# Altium PCB Motherboard.PcbDoc (part 2 of 4)
Units mm, origin at the board's own origin, x right, y up, seen from the top; angles counter-clockwise.
Board outline 133.86 x 61.62 mm, 4 copper layers (Top Layer, Ground Plane, Power Plane, Bottom Layer), stack 1.586 mm thick; 226 components, 149 nets, 791 pads, 852 vias.
Unrouted connection lines stored in the file: 19.
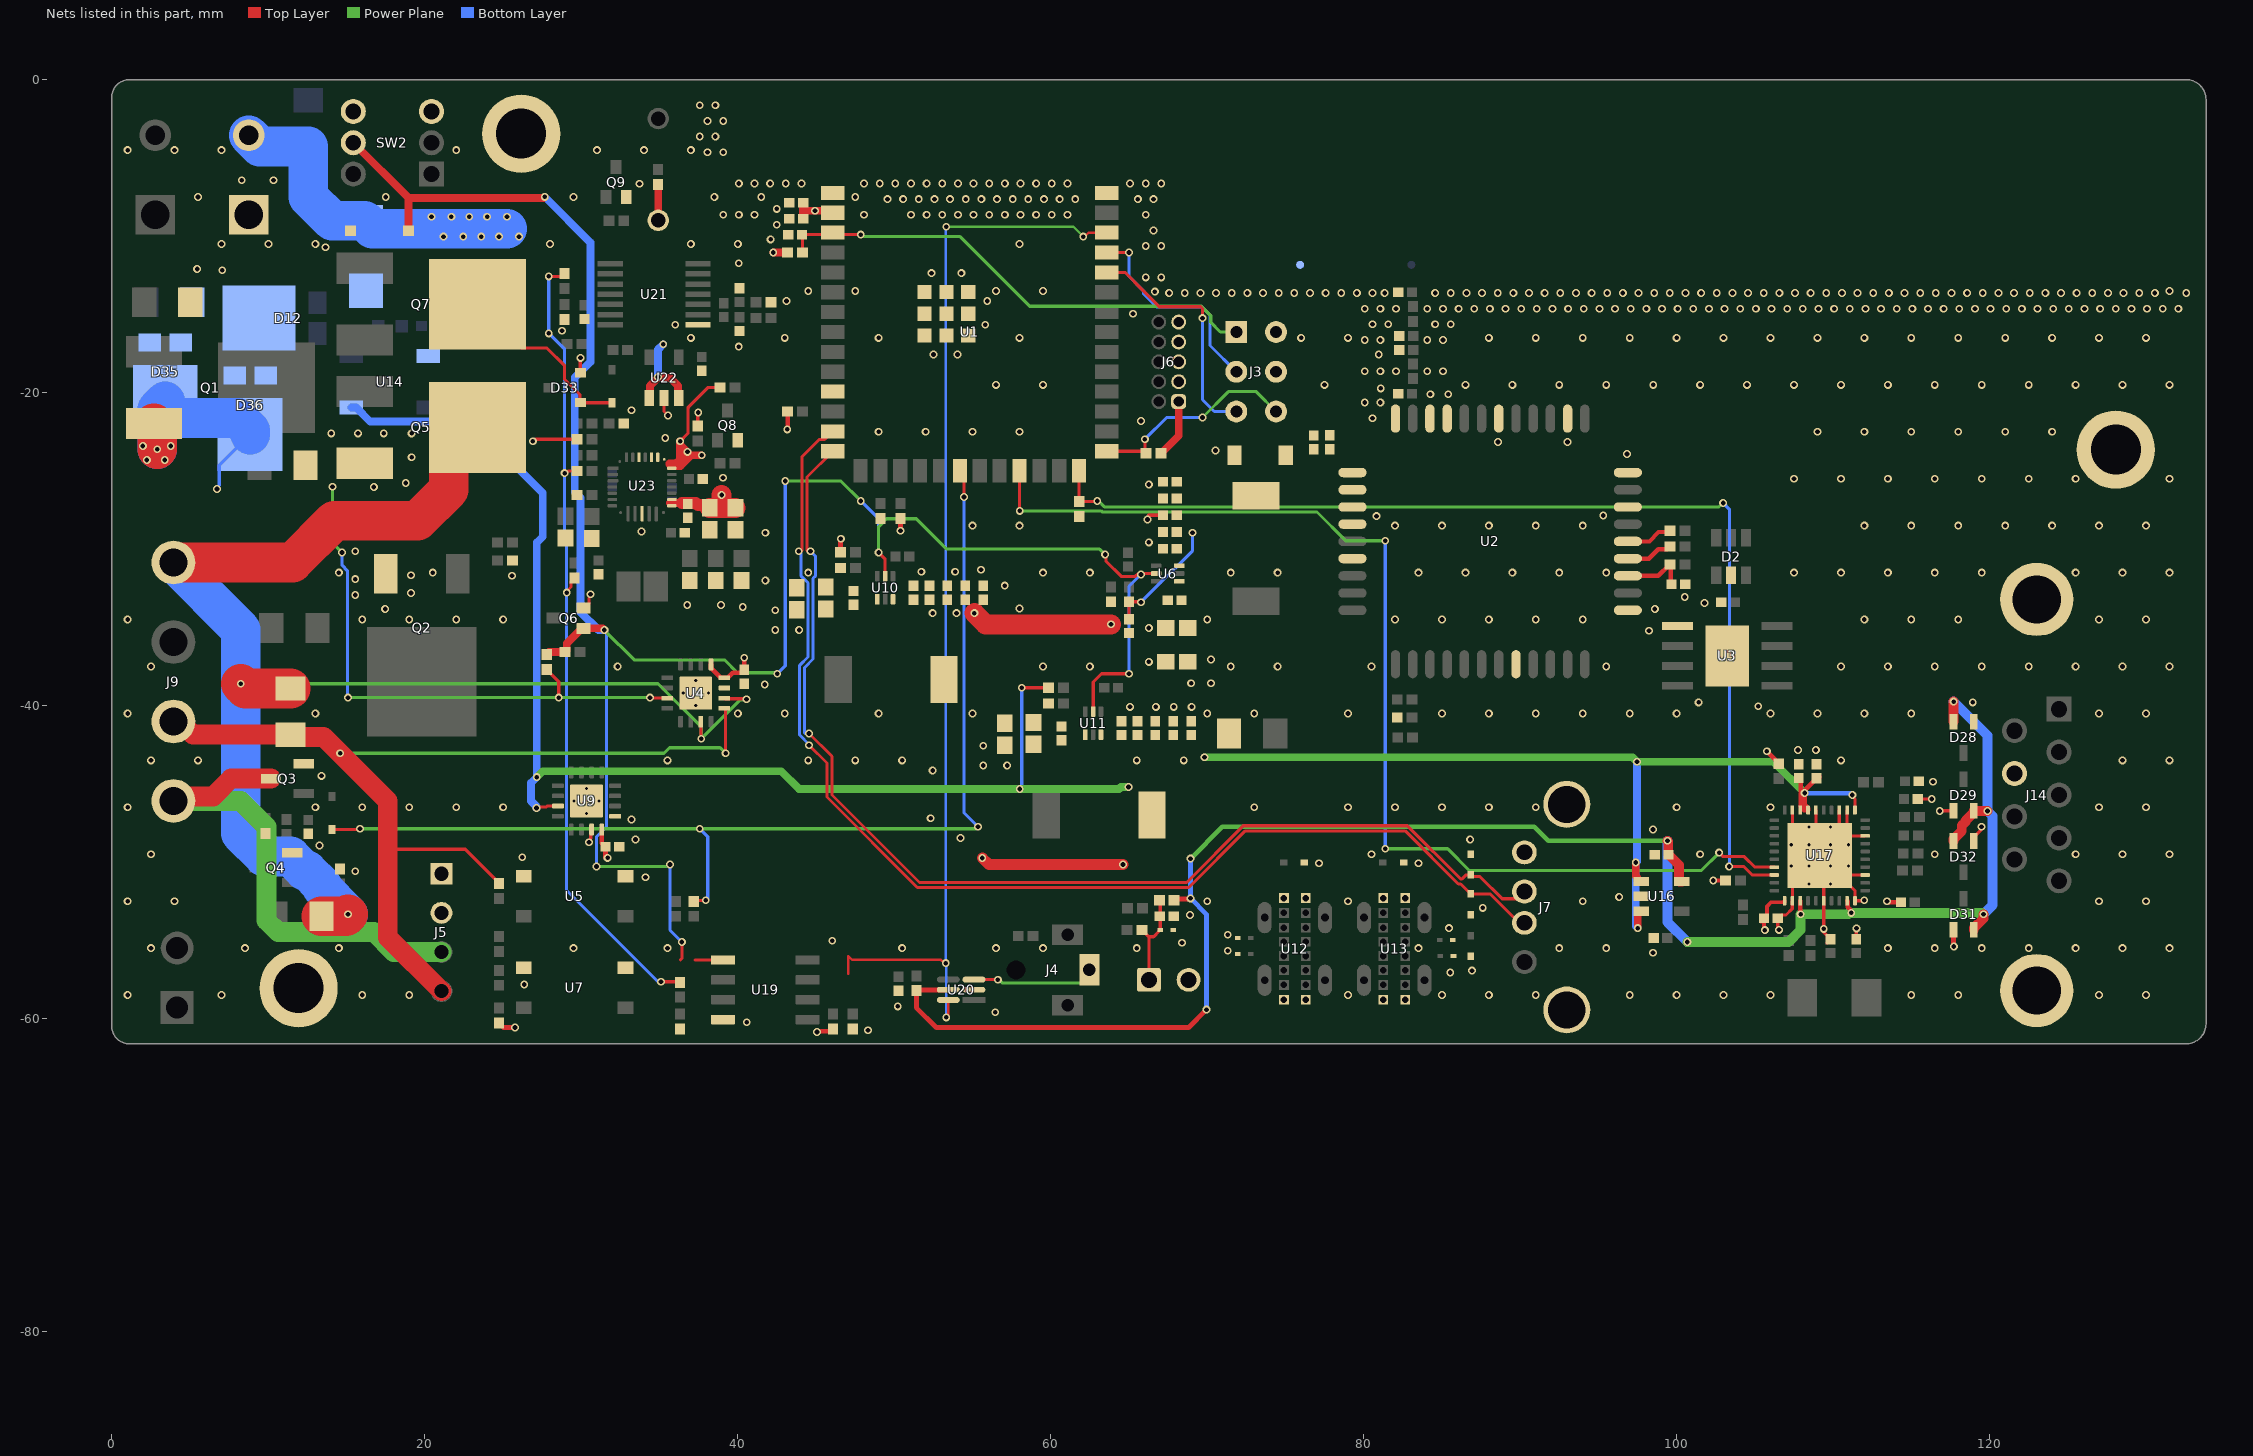
[diagram p4: the nets of this part, all layers, seen from the top]

## Part data
BUZ1: library part CMP-581a9557be5887dd-1, "Audio Buzzer Magnetic 3Vo-p 5Vo-p 70mA 3.5Vo-p 85dB Through Hole Pin Tray", LCSC_PN=C252915, Manufacturer Part Number=CMT-1285C-035, Manufacturer Part Number 2=GMC1205YA-16R2048, Lead-Free Status="Lead Free", Mounting Style="Through Hole", Octopart URL=https://octopart.com/cmt-1285c-035-cui-71811876, OctopartID=581a9557be5887dd, RoHS=Compliant
C1 C5 C6 C8 C9 C10 C11 C13 C14 C16 C30 C33 C34 C38 C41 C42 C46 C50 C59 C60 C62 C63 C64 C70 C73: library part CMP-1662-00020-1, LCSC_PN=C77020, ComponentLink1Description="Manufacturer URL", ComponentLink1URL=http://www.murata.com/, ComponentLink2Description=Datasheet, ComponentLink2URL=http://psearch.en.murata.com/capacitor/product/GRM155R60J105KE19%23.pdf
C2 C3 C21 C22 C23 C24 C25 C26 C27 C28 C29 C35 C36 C37 C49: library part CMP-1662-00020-1, LCSC_PN=C77000, ComponentLink1Description="Manufacturer URL", ComponentLink1URL=http://www.murata.com/, ComponentLink2Description=Datasheet, ComponentLink2URL=http://psearch.en.murata.com/capacitor/product/GRM155R60J105KE19%23.pdf
C4 C7 C15 C17 C52 C53 C61 C65 C66: library part CMP-1662-00020-1, LCSC_PN=C77009, ComponentLink1Description="Manufacturer URL", ComponentLink1URL=http://www.murata.com/, ComponentLink2Description=Datasheet, ComponentLink2URL=http://psearch.en.murata.com/capacitor/product/GRM155R60J105KE19%23.pdf
C12 C43 C54 C58: library part CMP-1662-00020-1, LCSC_PN=C33149, ComponentLink1Description="Manufacturer URL", ComponentLink1URL=http://www.murata.com/, ComponentLink2Description=Datasheet, ComponentLink2URL=http://psearch.en.murata.com/capacitor/product/GRM155R60J105KE19%23.pdf
C31 C32 C39 C40 C44 C45 C67 C68 C69 C71 C72 C77 C78: library part CMP-06035-022879-1, LCSC_PN=C91606
C55: library part CMP-1662-00020-1, LCSC_PN=C60133, ComponentLink1Description="Manufacturer URL", ComponentLink1URL=http://www.murata.com/, ComponentLink2Description=Datasheet, ComponentLink2URL=http://psearch.en.murata.com/capacitor/product/GRM155R60J105KE19%23.pdf
C56 C57: library part CMP-1662-00020-1, LCSC_PN=C77002, ComponentLink1Description="Manufacturer URL", ComponentLink1URL=http://www.murata.com/, ComponentLink2Description=Datasheet, ComponentLink2URL=http://psearch.en.murata.com/capacitor/product/GRM155R60J105KE19%23.pdf
C74 C76: library part CMP-1662-00020-1, LCSC_PN=C272875, ComponentLink1Description="Manufacturer URL", ComponentLink1URL=http://www.murata.com/, ComponentLink2Description=Datasheet, ComponentLink2URL=http://psearch.en.murata.com/capacitor/product/GRM155R60J105KE19%23.pdf
C75: library part CMP-1662-00020-1, LCSC_PN=C106205, ComponentLink1Description="Manufacturer URL", ComponentLink1URL=http://www.murata.com/, ComponentLink2Description=Datasheet, ComponentLink2URL=http://psearch.en.murata.com/capacitor/product/GRM155R60J105KE19%23.pdf
D1 D3 D30 D39 D40: "TVS Diode (Bi-directional)", LCSC_PN=C383211, Manufacturer_Name=LRC, Height=0.7mm, Manufacturer_Part_Number=LESD5D5.0CT1G
D2: library part CMP-924f5b40f9684d88-1, "ESDA Series 5 Channel 6.1 V 50 pF SMT Uni Directional Transil Array - SOT-23-6L", Breakdown Voltage="7.20 V", Case/Package=SOT-23, LCSC_PN=C6650, Operating Voltage="6.10 V", Power Rating="100 W", Lead-Free Status="Lead Free", Lifecycle Status=Active, Manufacturer Part Number=ESDA6V1-5SC6, Mounting Style="Surface Mount", Number of Pins=6, Octopart URL=http://octopart.com/esda6v1-5sc6-stmicroelectronics-347713, OctopartID=924f5b40f9684d88, Packaging="Tape & Reel (TR), Cut Tape (CT)", REACH SVHC Compliance="No SVHC", RoHS=Compliant, Size-Height="1.45 mm", Size-Length="3.05 mm", Size-Width="1.75 mm", TME=ESDA6V1-5SC6, Voltage Rating (DC)="6.10 V"
D4 D5 D7 D10 D11: library part CMP-1063-00120-1, "Transient Voltage Suppressor, Micro-Packaged Diode for ESD Protection, 2-Pin SOD-923, Pb-Free, Tape and Reel", LCSC_PN=C96512, Manufacturer="On Semiconductor", ComponentLink1Description="Manufacturer URL", ComponentLink1URL=http://www.onsemi.com/, ComponentLink2Description=Datasheet, ComponentLink2URL=http://www.onsemi.cn/pub_link/Collateral/ESD9B-D.PDF, ComponentLink3Description="Package Specification", ComponentLink3URL=http://www.onsemi.com/pub_link/Collateral/514AB.PDF, DatasheetVersion="Rev. 2", Direction=Bidirectional, IR Max (uA)=1, Mounting Technology="Surface Mount", Number of Lines=1, PackageDescription="2-Pin SOD, Body 0.8 x 0.6 mm", PackageReference=SOD-923-2-514AB-01, PackageVersion="Rev. C, 03/2011", Packing="Tape and Reel", PartNumber=ESD9B3.3ST5G, RoHS=Pb-Free, V(BR) Min (V)=5, VRWM Max (V)=3.3
D6: "TVS Diode (Uni-directional)", LCSC_PN=C404130, Manufacturer_Name=Vishay, Mouser Part Number=N/A, Datasheet Link=http://www.vishay.com/docs/88392/smbj.pdf, Height=2.44mm, Manufacturer_Part_Number=SMBJ13A, Mouser Price/Stock=https://www.mouser.co.uk/ProductDetail/Vishay-Semiconductors/SMBJ13A?qs=%252BA9HMDDz5KZG4MvB2mvPow%3D%3D
D8: library part CMP-1060-00573-1, "Zener Voltage Regulator, 500 mW, 2-Pin SOD-123, Pb-Free, Tape and Reel", LCSC_PN=C2759896, Manufacturer="On Semiconductor", ComponentLink1Description="Manufacturer URL", ComponentLink1URL=http://www.onsemi.com/, ComponentLink2Description=Datasheet, ComponentLink2URL=http://www.onsemi.com/pub_link/Collateral/MMSZ5221BT1-D.PDF, ComponentLink3Description="Package Specification", ComponentLink3URL=http://www.onsemi.com/pub_link/Collateral/425-04.PDF, DatasheetVersion="Rev. 12", Mounting Technology="Surface Mount", P Max (W)=0.5, PackageDescription="2-Pin SOD, Body 1.6 x 2.69 mm", PackageReference=SOD-123-2-425-04, PackageVersion="Rev. G, 10/2009", Packing="Tape and Reel", PartNumber=MMSZ5231BT1G, RoHS=Pb-Free, VZ Typ (V)=5.1
D9 D34: library part CMP-12790-000032-1, "DIODE SCHOTTKY 70V 150MW SOD323", Capacitance=2pF, Forward Current=15mA, LCSC_PN=C151442, Manufacturer="Diodes Inc", Max Junction Temp=+125°C, Max Repetitive Reverse Voltage=70V, Package=SOD323, Reverse Voltage=49V, Temperature="-55°C to +125°C", Temperature Range Low=-55°C, Automotive=No, Category=Diode, ComponentLink2Description=Datasheet, ComponentLink2URL=https://www.diodes.com/assets/Datasheets/ds31033.pdf, Device Class L1="Discrete Semiconductors", Device Class L2=Diodes, Device Class L3="Schottky Diodes", Digikey Description="DIODE SCHOTTKY 70V 150MW SOD323", Footprint Url=https://www.diodes.com/assets/Package-Files/SOD323.pdf, Height=1.2mm, Lead Free=Yes, Manufacturer Part Number=1N5711WS-7-F, Mouser Description="Schottky Diodes & Rectifiers 70V 200mW", Octopart=https://octopart.com/1n5711ws-7-f-diodes+inc.-323167, RoHS=TRUE, Standoff Height=0.05mm, Temperature Range High=+125°C
D12 D35 D36: library part CMP-00278-84328658-1, "FSV1550V Rectifier Diode, Schottky, 1 Phase, 1 Element, 15A, 50V V(RRM), Silicon, TO-277", Average Rectified Current=15A, Case/Package=TO-277-3, LCSC_PN=C668953, Manufacturer Lifecycle Status=ACTIVE, Max Forward Surge Current (Ifsm)=300A, Max Repetitive Reverse Voltage (Vrrm)=50V, Element Configuration=Single, Forward Current=15A, Lifecycle Status=Production, Max Reverse Voltage (DC)=50V, Mount="Surface Mount", NexarPartId=84328658, Packaging="Cut Tape", RoHS=Compliant, Schedule B="8541100080, 8541100080", Weight=113.6mg
D27: library part CMP-02520-000013-1, "LED BLUE 0603 SMD", Ambient Temperature Range High=+80°C, Ambient Temperature Range Low=-20°C, Colour=Blue, Forward Current=20mA, Forward Voltage=3.8V, LCSC_PN=C435849, Manufacturer="Vishay Semiconductor Opto Division", Package=6.541-5094.01-4, Power Dissipation=76mW, Temperature="-20°C to +80°C", Automotive=No, Category=Diode, ComponentLink2Description=Datasheet, ComponentLink2URL=http://www.vishay.com/docs/82437/vlmo1300.pdf, Device Class L1=Optoelectronics, Device Class L2=LEDs, Device Class L3=unset, Digikey Description="LED BLUE 0603 SMD", Height=1mm, Lead Free=Yes, Led Orientation="Top View", Luminous Intensity=28-180mcd, Manufacturer Part Number=VLMB1300-GS08, Mouser Description="LED; SMD; 0603; blue; 28-180mcd; 1.6x0.8x0.8mm; 130°; 2.8÷3.8V; 20mA", Octopart=https://octopart.com/vlmb1300-gs08-vishay-22022408, Peak Emmision Wavelength=468nm, RoHS=TRUE, Temperature Range High=+80°C, Temperature Range Low=-20°C, Viewing Angle=130°, Wavelength=475nm
D28 D29 D31 D32: "Diode", LCSC_PN=C93035, Manufacturer_Name="Diodes Inc.", Mouser Part Number=621-BAV99W-F, Arrow Part Number=BAV99W-7-F, Arrow Price/Stock=https://www.arrow.com/en/products/bav99w-7-f/diodes-incorporated?region=europe, Datasheet Link=https://www.diodes.com/assets/Datasheets/ds30045.pdf, Height=1.1mm, Manufacturer_Part_Number=BAV99W-7-F, Mouser Price/Stock=https://www.mouser.co.uk/ProductDetail/Diodes-Incorporated/BAV99W-7-F?qs=KrBKXozF1ElcNxS3QKF7wg%3D%3D
D33: library part CMP-0417-00003-1, "Schottky Barrier Diode, 30 V, 2 uA, -55 to 150 degC, 3-Pin SOT23, RoHS, Tape and Reel", LCSC_PN=C181200, Manufacturer="NXP Semiconductors", Temperature Range="-55 to 150 degC", Cd (pF)=10, ComponentLink1Description="Manufacturer URL", ComponentLink1URL=http://www.nxp.com/, ComponentLink2Description=Datasheet, ComponentLink2URL=http://www.nxp.com/documents/data_sheet/BAT54_SER.pdf, DatasheetVersion="Rev. 5", IR (uA)=2, Mounting Technology="Surface Mount", PackageDescription="3-Pin Plastic Surface-mounted Package, Body 1.3 x 2.9 mm, Pitch 0.95 mm", PackageReference=SOT23-3, Packing="Tape and Reel", PartNumber=BAT54C, RoHS=TRUE, Rth(j-a) (K/W)=500, Trr (ns)=5, VF (mV)=800, VR (V)=30
J1 J15: library part CMP-7a42b7ee166ba585-1, "Terminal block, 5mm 2 Pos, through hole male.", LCSC Part=C8445, Manufacturer Part Number="2EDGK-5.08-02P-14-00AH + 2EDGVC-5.08-02P", Manufacturer Part Number 2="WJ2EDGVC-5.08-2P + WJ2EDGK-5.08-2P", LCSC_PN=C8445, Octopart URL=https://octopart.com/2edgk-5.08-02p-14-00ah-degson-78006607, OctopartID=7a42b7ee166ba585
J2: library part CMP-1d67d451da9ec2a0-3, "Conn Shrouded Header HDR 2 POS 2.5mm Solder ST Thru-Hole Box", LCSC Part=C158012, Manufacturer Part Number=B2B-XH-A, Contact Material="Phosphor Bronze", LCSC_PN=C158012, Octopart URL=https://octopart.com/b2b-xh-a-jst-3990175, OctopartID=1d67d451da9ec2a0, Orientation=Straight
J3: library part CMP-bcf575fbeff46332-1, "Dual Row Connector Female Samtec SLW-103-01-T-D", Color=Black, LCSC_PN=C492420, Manufacturer Part Number=SLW-103-01-T-D, Operating Temperature="105 °C (max)", Voltage Rating (AC)="400 V", Contact Material="Phosphor Bronze", Contact Plating=Tin, Gender=Female, Housing Color=Black, Housing Material=Plastic, Lead-Free Status="Lead Free", Mounting Style="Through Hole, Vertical", Number of Contacts=6, Number of Positions=6, Number of Rows=2, Octopart URL=https://octopart.com/slw-103-01-t-d-samtec-292455, OctopartID=bcf575fbeff46332, Packaging=Tube, Pin Pitch="2.54 mm", REACH SVHC Compliance="No SVHC", RoHS=Compliant, Size-Height="4.57 mm", Size-Length="7.62 mm", Size-Width="4.95 mm"
J4: LCSC_PN=C2884976
J5: library part CMP-17439-000250-1, "CONN HEADER VERT 4POS 2.5MM", Color=Natural, Contact Resistance=20mR, Current Rating=3A, Flammability Rating="UL94 V-0", Housing Color=White, Insulation Resistance=1GR, LCSC_PN=C144395, Max Operating Temperature=85°C, Max Voltage Rating (AC)=250V, Min Operating Temperature=-25°C, Package Quantity=500, Connector Type=Header, Contact Finish - Mating=TIN, Contact Material=Brass, Contact Plating=Tin, Contact Shape=Square, Contact Type="Male Pin", Depth=5.75mm, Fastening Type=Detent, Gender=Male, Housing Material=Polyamide, Insulation Color=Natural, Insulation Material=Nylon, Lead Free="Lead Free", Lead Pitch=2.5mm, Length=12.4mm, Mated Stacking Heights=9.8mm, Material=Polyamide, Max Current Rating=3A, Max Voltage Rating (DC)=250V, Mount="Through Hole", Number of Contacts=4, Number of Positions=4, Number of Rows=1, Orientation=Straight, Packaging=Bulk, Pitch=2.5mm, REACH SVHC="No SVHC", Series=XH, Termination=Solder, Voltage Rating=250V, Voltage Rating (AC)=250V, Wire/Cable Gauge=22AWG
J6: library part CMP-1502-00948-3, Color=Black, Contact Resistance=20mΩ, Current Rating=1A, LCSC_PN=C7501289, Max Operating Temperature=105°C, Min Operating Temperature=-40°C, Operating Supply Voltage=100V, Connector Type="Male Pin", Contact Material=Copper, Contact Mating Length=3.81mm, Contact Plating=Gold, Gender=Male, Height=5.65mm, Lead Pitch=1.27mm, Mount="Through Hole", NexarPartId=32855586, Number of Contacts=10, Number of Pins=10, Number of Positions=10, Number of Rows=2, Orientation=Vertical, Packaging=Box, Pitch=1.27mm, REACH SVHC=Unknown, RoHS=Compliant, Row Spacing=1.27mm, Termination=Solder, Voltage Rating=100V
J7: library part CMP-27c8ec666f97f80f-1, "Conn USB 2.0 Type A RCP 4 POS Solder ST Thru-Hole 4 Terminal 1 Port Tray", Housing Color=Blue, LCSC Part=C32896, Manufacturer Part Number=1734366-3, Contact Plating="Gold Flash, Gold Flash over Nickel", ELV Compliant=Compliant, Gender=Female, Housing Material=Thermoplastic, LCSC_PN=C32896, Lead-Free Status="Lead Free", Lifecycle Status=Active, Octopart URL=http://octopart.com/1734366-3-te+connectivity-44330297, OctopartID=27c8ec666f97f80f, Packaging=Tray, RoHS=Compliant
J8: "Connector", LCSC_PN=C8396, Manufacturer_Name="Ningbo Kangnex", Datasheet Link=https://datasheet.lcsc.com/szlcsc/Ningbo-Kangnex-Elec-WJ15EDGVC-3-81-2P_C8396.pdf, Height=9.35mm, Manufacturer_Part_Number=WJ15EDGVC-3.81-2P
J9: BOM_JLCPCB Part Class="Extended Part", BOM_Manufacturer="Cixi Kefa Elec", LCSC_PN=C441388, BOM_Manufacturer Part=KF2EDGVC-5.08-4P, BOM_Supplier=LCSC, BOM_Supplier Part=C441388, Contributor=LCSC, spicePre=C, spiceSymbolName=KF2EDGVC-5.08-4P
J14: library part CMP-03367-000004-1, "CONN D-SUB RCPT 9POS VERT SOLDER", Current Rating=6A, LCSC_PN=C189689, Manufacturer="TE Connectivity", Temperature="-55°C to +105°C", Temperature Range High=+105°C, Temperature Range Low=-55°C, Automotive=No, Category=Conn, ComponentLink2Description=Datasheet, ComponentLink2URL=https://www.te.com/commerce/DocumentDelivery/DDEController?Action=showdoc&DocId=Customer+Drawing%7F5747706%7FB%7Fpdf%7FEnglish%7FENG_CD_5747706_B.pdf%7F2-5747706-0, Conn Gender=Female, Conn Orientation=Vertical, Contact Material=Gold,Nickel, Device Class L1=Connectors, Device Class L2="D-Sub Connectors", Device Class L3=unset, Digikey Description="CONN D-SUB RCPT 9POS VERT SOLDER", Height=0.494inch, Is Female=yes, Lead Free=Yes, Manufacturer Part Number=2-5747706-0, Mouser Description="D-Sub Standard Connectors RECP FRNT MTL SHL 9P retention inserts", Number of Contacts=9, Octopart=https://octopart.com/2-5747706-0-te+connectivity-39499683, Package=2-5747706-0, Pitch=2.74mm, RoHS=TRUE, Shielding=true
L1 L2 L3: library part CMP-06042-006799-1, "Shielded Wirewound Inductor 3.3uH 30% 6800mA 0.0144Ω SMD", Case/Package=SMD/SMT, Current Rating=6.8A, DC Resistance (DCR)=14.4mR, Inductance=3.3uH, LCSC_PN=C514864, Resistor Type=Wirewound, Saturation Current=7.7A, Test Frequency=100kHz, Tolerance=30%, Core Material=Ferrite, Height - Seated (Max)=0.177inch, Length=0.315inch, Max DC Current=6.8A, Mount="Surface Mount", Number of Pins=2, Packaging="Tape and Reel", Shielding=Shielded, Width=0.315inch
L5: library part CMP-06042-011635-1, "Shielded Wirewound Inductor 1uH 20% 2900mA 0.048Ω 0806 (2016)", Inductance=1uH, LCSC_PN=C521238
Q1 Q5 Q7: library part CMP-3103264-6, "Single P-Channel 30 V 4.5 mOhm 100 nC OptiMOS Power Mosfet - TO-252-3-11", LCSC_PN=C148439, Manufacturer Part Number 2=WSF70P03, Operating Temperature="175 °C (max)", Lead-Free Status="Lead Free", Manufacturer Part Number=IPD90P03P404ATMA1, Mounting Style="Surface Mount", Number of Pins=3, Octopart URL=https://octopart.com/ipd90p03p404atma1-infineon-21386769, OctopartID=f6ad3ee185da296a, Packaging=Reel, Polarity=P-Channel, REACH SVHC Compliance="No SVHC", RoHS=Compliant
Q2: library part CMP-32901-000143-1, "MOSFET N-CH 30V 161A DPAK", Continuous Drain Current=161A, Drain To Source Breakdown Voltage=30V, Drain To Source Resistance=3.2mΩ, Gate To Source Voltage=20V, Input Capacitace At Vds="4380pF @ 15V", LCSC_PN=C21988, Manufacturer=Infineon, Max Forward Diode Voltage=1V, Max Junction Temp=+175°C, Package=PG-TO252-3, Power Dissipation=140W, Pulse Drain Current=620A, Temperature="-55°C to +175°C", Temperature Range Low=-55°C, Automotive=No, Category=Trans, ComponentLink2Description=Datasheet, ComponentLink2URL=https://www.infineon.com/dgdl/irlr7843pbf.pdf?fileId=5546d462533600a40153566de53526d8, Depletion Mode=False, Device Class L1="Discrete Semiconductors", Device Class L2=Transistors, Device Class L3=MOSFETs, Digikey Description="MOSFET N-CH 30V 161A DPAK", Drain To Source Voltage=30V, Footprint Url=https://www.infineon.com/cms/en/product/packages/PG-TO252/PG-TO252-3-901/, Gate Charge At Vgs="34nC @ 4.5V", Height=2.52mm, Lead Free=Yes, Manufacturer Part Number=IRLR7843TRPBF, Number Of Channels=1, Number Of N Channels=1, Octopart=https://octopart.com/irlr7843trpbf-infineon-65875062, Reverse Recovery Charge=36nC, Reverse Recovery Time=39ns, RoHS=TRUE, Rthja Max=50°C/W, Temperature Range High=+175°C, Threshold Vgs Max=2.3V, Threshold Vgs Min=1.4V, Turn Off Delay Time=34ns, Turn On Delay Time=25ns
Q3 Q4: "Transistor", LCSC_PN=C143946, Manufacturer_Name=Infineon, Mouser Part Number=942-IRLML6244TRPBF, Arrow Part Number=IRLML6244TRPBF, Arrow Price/Stock=https://www.arrow.com/en/products/irlml6244trpbf/infineon-technologies-ag?region=nac, Datasheet Link=http://www.infineon.com/dgdl/irlml6244pbf.pdf?fileId=5546d462533600a4015356686fed261f, Height=1.12mm, Manufacturer_Part_Number=IRLML6244TRPBF, Mouser Price/Stock=https://www.mouser.co.uk/ProductDetail/Infineon-IR/IRLML6244TRPBF?qs=9%252BKlkBgLFf1HkY%2F2U%252BIhLQ%3D%3D
Q6 Q8 Q9: library part CMP-2000-05968-1, "N-Channel Enhancement Mode Mosfet, 50 V, 200 mA, -55 to 150 degC, 6-Pin SOT-323, RoHS, Tape and Reel", Id - Continuous Drain Current=200mA, LCSC_PN=C24553, Manufacturer=DiodesIncorporated, Maximum Operating Temperature=+150C, Minimum Operating Temperature=-55C, Package / Case=SOT-323-3, Package Description="3-Pin Small Outline Transistor, Body 2 x 1.25 mm, Pitch 0.65 mm", Package Reference=SOT323, Pd - Power Dissipation=200mW, Rds On - Drain-Source Resistance=1.4Ohms, Vds - Drain-Source Breakdown Voltage=75V, Vgs - Gate-Source Voltage=20V, Brand=DiodesIncorporated, Channel Mode=Enhancement, Configuration=Single, Datasheet URL=http://www.diodes.com/_files/datasheets/ds30206.pdf, Datasheet Version="Rev. 11-2, 09/2013", Factory Pack Quantity=3000, Forward Transconductance - Min=0.1S, Height=1mm, Length=2.2mm, Manufacturer URL=http://www.diodes.com/, Mounting Style=SMD/SMT, Mounting Technology=SurfaceMount, Number Of Channels=1Channel, Packaging=Reel, Product=MOSFETSmallSignal, Product Category=MOSFET, RoHS=True, Series=BSS138, Technology=Si, Transistor Polarity=N-Channel, Transistor Type=1N-Channel, Type=EnhancementModeFieldEffectTransistor, Typical Turn-Off Delay Time=20ns, Typical Turn-On Delay Time=20ns, Unit Weight=0.000212oz, Width=1.35mm
R1 R52: library part CMP-0abdc173b10ad57a-1, Case/Package=1206, LCSC_PN=C601094, Manufacturer Part Number=WSLP12065L000FEA, Manufacturer Part Number 2=FMF06FTHR005-LHL, Power=1W, Resistance=0,002, Lifecycle Status="Not Listed by Manufacturer", Octopart URL=https://octopart.com/1-2176055-0-te+connectivity-46440145, OctopartID=0abdc173b10ad57a, OrderingCode=WSLP12065L000FEA, Packaging="Tape & Reel (TR)"
R2 R9 R11 R19 R21 R23 R25 R29 R30 R31 R33 R34 R35 R37 R38 R39 R40 R41 R42 R46 R57 R59 R71 R83 R84 R87 R91: library part CMP-2002-07472-1, LCSC_PN=C190095
R3 R8 R15 R24 R47 R53 R78 R79: library part CMP-2002-07472-1, LCSC_PN=C60485
R4 R6 R7 R10 R12 R13 R20 R26 R43 R44 R49 R62: library part CMP-2002-07472-1, LCSC_PN=C106235
R5 R51: library part CMP-0abdc173b10ad57a-1, Case/Package=1206, LCSC_PN=C601090, Manufacturer Part Number=WSLP12065L000FEA, Power=1W, Resistance=0,1, Lifecycle Status="Not Listed by Manufacturer", Octopart URL=https://octopart.com/1-2176055-0-te+connectivity-46440145, OctopartID=0abdc173b10ad57a, Packaging="Tape & Reel (TR)"
R14 R80 R81 R86 R94: library part CMP-2002-07472-1, LCSC_PN=C60491
R16 R17 R18 R88 R90 R95: library part CMP-2002-07472-1, LCSC_PN=C106233
R22: library part CMP-0abdc173b10ad57a-1, Case/Package=1206, LCSC_PN=C705560, Manufacturer Part Number=WSLP12065L000FEA, Power=1W, Resistance=0,1, Lifecycle Status="Not Listed by Manufacturer", Octopart URL=https://octopart.com/1-2176055-0-te+connectivity-46440145, OctopartID=0abdc173b10ad57a, Packaging="Tape & Reel (TR)"
R27 R28: library part CMP-0abdc173b10ad57a-1, Case/Package=1206, LCSC_PN=C108081, Manufacturer Part Number=WSLP12065L000FEA, Manufacturer Part Number 2=FMF06FTHR005-LHL, Power=1W, Resistance=0,002, Lifecycle Status="Not Listed by Manufacturer", Octopart URL=https://octopart.com/1-2176055-0-te+connectivity-46440145, OctopartID=0abdc173b10ad57a, OrderingCode=WSLP12065L000FEA, Packaging="Tape & Reel (TR)"
R32: library part CMP-2002-07472-1, LCSC_PN=C93943
R36 R92: library part CMP-2002-07472-1, LCSC_PN=C851231
R45 R76: library part CMP-2002-07472-1, LCSC_PN=C185398, Manufacturer="Yageo / Phycomp"
R50: library part CMP-2002-07472-1, LCSC_PN=C114756
R60 R61 R65 R66 R67 R68 R69: library part CMP-2002-07472-1, LCSC_PN=C413066
R75: library part CMP-2002-07472-1, LCSC_PN=C149896
R77: library part CMP-2002-07472-1, LCSC_PN=C852697
R89: library part CMP-0abdc173b10ad57a-1, "0.002R 1206 0.5W 1%", Case/Package=1206, LCSC_PN=C723507, Manufacturer Part Number=WSLP12065L000FEA, Manufacturer Part Number 2=FMF06FTHR005-LHL, Power=1W, Resistance=0,005, Lifecycle Status="Not Listed by Manufacturer", Octopart URL=https://octopart.com/1-2176055-0-te+connectivity-46440145, OctopartID=0abdc173b10ad57a, OrderingCode=WSLP12065L000FEA, Packaging="Tape & Reel (TR)"
R93: library part CMP-2002-07472-1, LCSC_PN=C138061
RF_PCB1: library part CMP-e704afk8c25r4a5ypw1c-12, "GSM900 and GSM1800  Frequency Bands PCB antenna", CustomComponentID=e704afk8c25r4a5ypw1c
SW2: BOM_JLCPCB Part Class="Extended Part", BOM_Manufacturer="XKB Enterprise", LCSC_PN=C318863, BOM_Manufacturer Part=XKB7070-Z, BOM_Supplier=LCSC, BOM_Supplier Part=C318863, Contributor=LCSC, spicePre=S, spiceSymbolName=XKB7070-Z
U1: "Integrated Circuit", LCSC_PN=C2913198, Manufacturer_Name="Espressif Systems", Mouser Part Number=356-ESP32-S3WROOM1N8, Datasheet Link=https://www.espressif.com/sites/default/files/documentation/esp32-s3-wroom-1_wroom-1u_datasheet_en.pdf, Height=3.25mm, Manufacturer_Part_Number=ESP32-S3-WROOM-1-N8, Mouser Price/Stock=https://www.mouser.co.uk/ProductDetail/Espressif-Systems/ESP32-S3-WROOM-1-N8?qs=Wj%2FVkw3K%252BMC1mq0KGPvoSQ%3D%3D
U2: library part CMP-72dbb8ea0133ad1c-5, "Module: GSM/Bluetooth; GPRS; 2G; 1800MHz, 900MHz; 85.6kbps; SMD", LCSC Part=C69120, LCSC_PN=C69119, Manufacturer Part Number=SIM800C, Mounting Style="Surface Mount", Octopart URL=http://octopart.com/sim800c-simcom-54220430, OctopartID=72dbb8ea0133ad1c
U3: library part CMP-ce8f06c57f401148-2, "Embedded SIM card in MFF2", LCSC_PN=C5122390, DNP=DNP
U4 U9: library part CMP-0704-00001-2, "Triple Channel Shunt and Bus Voltage Monitor, 120 dB, 2.7 to 5.5 V, -40 to 125 degC, 16-Pin VQFN (RGV), Green (RoHS & no Sb/Br), Tape and Reel", LCSC_PN=C181255, Manufacturer="Texas Instruments", Offset Voltage (max)="+/- 80 uV", Operating Supply Range="2.7 to 5.5 V", Quiescent Current (Typ)="350 uA", Rating=Catalog, Temperature Range="-40 to 125 degC", Voltage Input Range (Bus)="0 to 26 V", CMR (Typ)="120 dB", ComponentLink1Description="Manufacturer URL", ComponentLink1URL=http://www.ti.com/, ComponentLink2Description=Datasheet, ComponentLink2URL=http://www.ti.com/lit/ds/symlink/ina3221.pdf, ComponentLink3Description="Package Specification", ComponentLink3URL=http://www.ti.com/lit/ds/symlink/ina3221.pdf, DatasheetVersion=SBOS576A, Gain="1 V/V", Gain Error (max)=0.25%, Mounting Technology="Surface Mount", PackageDescription="16-Pin Quad Flat No-lead Package, Body 4 x 4 mm, Pitch 0.65 mm", PackageReference=RGV0016A, PackageVersion=SBOS576A, Packing="Tape and Reel", PartNumber=INA3221AIRGVR, RoHS=TRUE
U5 U7: library part CMP-2000-05202-1, "Optocoupler DC-IN 1-CH Transistor DC-OUT 4-Pin Mini-Flat", LCSC_PN=C125117, Manufacturer=Lite-On, Maximum Collector Current=50mA, Maximum Collector Emitter Saturation Voltage=200mV, Maximum Collector Emitter Voltage=80V, Maximum Current Transfer Ratio=600%, Maximum Forward Voltage=1.4V, Maximum Operating Temperature=100C, Maximum Power Dissipation=170mW, Maximum Reverse Voltage=6V, Minimum Current Transfer Ratio=50%, Minimum Isolation Voltage=3750Vrms, Minimum Operating Temperature=-55C, Supplier_Package=(Min)i-Flat, Typical Forward Voltage=1.2V, Datasheet URL=https://datasheet.ciiva.com/16216/ltv-356t-16216247.pdf, Datasheet Version=May-09, Family=LTV-356T, Input Type=DC, Manufacturer URL=http://www.us.liteon.com/, Maximum Fall Time=18us, Maximum Input Current=50mA, Maximum Rise Time=18us, Mounting=SurfaceMount, Number of Channels per Chip=1, Output Device=Transistor, Output Type=DC, Pin_Count=4, Product Height=2mm, Product Length=3.6mm, Product Type=TransistorandPhotovoltaicOutputPhotoCouplers, Product Width=4.4mm, Typical Fall Time=3us, Typical Rise Time=4us
U6 U10 U11: library part CMP-04918-000435-1, "POWER MANAGEMENT", LCSC_PN=C779412
U12 U13: JLCPCB Part Class="Extended Part", LCSC_PN=C3151747, Manufacturer="SHOU HAN(首韩)", Contributor=lcsc, Manufacturer Part="TYPE-C 16PLC-H10.0", spicePre=U, spiceSymbolName="TYPE-C 16PLC-H10.0", Supplier=LCSC, Supplier Part=C3151747
U14: library part CMP-2000-05026-1, "Intelligent Control LED Integrated Light Source, 3.5 to 5.3 V, -25 to 80 degC, 4-Pin SMD, RoHS, Tape and Reel", Color=Red,Green,Blue(RGB), LCSC_PN=C2761795, Manufacturer=Adafruit-Industries-LLC, Package Description="4-Pin Surface Mount Device, Body 5 x 5 mm", Package Reference=1655, Category=Optoelectronics, Configuration=Discrete, Controller Type=-, Datasheet URL=http://datasheet.octopart.com/ADA1655-Adafruit-Industries-datasheet-32028139.pdf, Datasheet Version=May-13, Family=Addressable,Specialty, Interface=-, Manufacturer URL=https://www.adafruit.com/, Mounting Type=SurfaceMount, Number of LEDs=10, Series=Neopixel, Size / Dimension=5.00mmLx5.00mmW, Utilized LED=WS2812(5050)
U16 U22: BOM_JLCPCB Part Class="Extended Part", BOM_Manufacturer=EXAR, LCSC_PN=C9055, BOM_Manufacturer Part=SPX3819M5-L-3-3/TR, BOM_Supplier=LCSC, BOM_Supplier Part=C9055, spicePre=U, spiceSymbolName=SPX3819M5-L-3-3/TR
U17: library part CMP-0767-00003-2, "Integrated Analog Front End for Pulse Oximeter, 2 to 3.6 V Rx, 3 to 5.25 V Tx, -40 to 85 degC, 40-Pin VQFN (RHA), RoHS, Tape and Reel", LCSC_PN=C2651608, Manufacturer="Texas Instruments", Operating Temperature Range="-40 to 85 degC", # Input Channels=1, AFE Analog Supply="2 to 3.6 V", AFE Digital Supply="2 to 3.6 V", CMRR="75 dB", ComponentLink1Description="Manufacturer URL", ComponentLink1URL=http://www.ti.com/, ComponentLink2Description=Datasheet, ComponentLink2URL=http://www.ti.com/lit/ds/symlink/afe4490.pdf, ComponentLink3Description="Package Specification", ComponentLink3URL=http://www.ti.com.cn/cn/lit/ml/mpqf135c/mpqf135c.pdf, DatasheetVersion=SBAS602F, Mounting Technology="Surface Mount", PackageDescription="40-Pin Plastic Quad Flatpack No-Lead, Body 6 x 6 mm, Pitch 0.5 mm", PackageReference=RHA-40, PackageVersion=4204276/E, Packing=RHA0040B, PartNumber=AFE4490RHAR, Resolution="22 Bits", RoHS=TRUE, Sample Rate (max)="1.3 KSPS", Transmit Controller Supply="3 to 5.25 V"
U19: library part CMP-04896-000007-1, "36V JI.3 DUAL COMPARATOR", Ambient Temperature Range High=+125°C, Ambient Temperature Range Low=-40°C, Input Bias Current=-0.0035uA, Input Offset Voltage=4mV, LCSC_PN=C2869804, Manufacturer="Texas Instruments", Max Junction Temp=+150°C, Max Supply Voltage=36V, Min Supply Voltage=3V, Nominal Supply Current=400-550uA, Output Current Per Channel=25mA, Package=D0008A, Temperature="-40°C to +125°C", Automotive=No, Category=IC, ComponentLink2Description=Datasheet, ComponentLink2URL=http://www.ti.com/lit/ds/symlink/lm2903b.pdf, Device Class L1="Integrated Circuits (ICs)", Device Class L2="Linear ICs", Device Class L3=Comparators, Digikey Description="36V JI.3 DUAL COMPARATOR", Height=1.75mm, Lead Free=Yes, Manufacturer Part Number=LM2903BIDR, Number Of Channels=2, Octopart=https://octopart.com/lm2903bidr-texas+instruments-104977165, Response Time=1us, RoHS=TRUE, Standoff Height=0.11mm, Temperature Range High=+125°C, Temperature Range Low=-40°C
U20: library part CMP-0859-00516-4, "IC SWITCH SPDT SC70-6", Case/Package=SC, High Level Output Current=128mA, LCSC_PN=C38663, Max Operating Temperature=125°C, Max Supply Current=10uA, Max Supply Voltage=5.5V, Min Operating Temperature=-40°C, Min Supply Voltage=1.65V, On-State Resistance=15R, Operating Supply Current=1uA, Package Quantity=3000, Bandwidth=300MHz, Contact Plating=Gold, Height=0.9mm, Lead Free="Lead Free", Length=2mm, Low Level Output Current=128mA, Mount="Surface Mount", Nominal Supply Current=10uA, Number of Bits=1, Number Of Channels=1, Number of Inputs=1, Number of Outputs=2, Number of Pins=6, Packaging="Tape and Reel", Polarity=Non-Inverting, Propagation Delay=300ps, Radiation Hardening=No, REACH SVHC="No SVHC", RoHS Compliant=Yes, Supply Type=Single, Termination=SMD/SMT, Throw Configuration=SPDT, Turn-Off Delay Time=3.8ns, Turn-On Delay Time=5.7ns, Weight=8.8E-05oz, Width=1.25mm
U21: library part CMP-04911-000003-1, "IC BATT MON MULTICELL 14TSSOP", Ambient Temperature Range High=+85°C, Ambient Temperature Range Low=-40°C, LCSC_PN=C2877075, Manufacturer="Texas Instruments", Max Junction Temp=+100°C, Max Supply Voltage=4.5V, Min Supply Voltage=2.45V, Nominal Supply Current=133uA, Package=PW0014A, Temperature="-40°C to +85°C", Automotive=No, Category=IC, ComponentLink2Description=Datasheet, ComponentLink2URL=https://www.ti.com/lit/ds/symlink/bq34110.pdf, Device Class L1="Integrated Circuits (ICs)", Device Class L2="Power Management ICs", Device Class L3="Battery Management", Digikey Description="IC BATT MON MULTICELL 14TSSOP", Height=1.2mm, Lead Free=Yes, Manufacturer Part Number=BQ34110PWR, Mouser Description="Multi-Chemistry High-Cell Count Battery Fuel Gauge With Integrated Rarely Discharged Module 14-TSSOP -40 to 85", Number Of Cells=4, Number of Outputs=2, Octopart=https://octopart.com/bq34110pwr-texas+instruments-75529711, RoHS=TRUE, Standoff Height=0.05mm, Temperature Range High=+85°C, Temperature Range Low=-40°C
U23: library part CMP-04911-000031-1, "I2C CONTROLLED, 5-A, 1-4 CELL BU", LCSC_PN=C2862876, RoHS Compliant=Yes
Y1: library part CMP-2000-05033-2, "Crystal 8MHz ±20ppm 18pF SMD-2 5mm x 3.2mm", Case/Package=CSMD, ESR (Equivalent Series Resistance)=140R, Frequency=8MHz, Frequency Stability=30ppm, Frequency Tolerance=20ppm, LCSC_PN=C144380, Load Capacitance=18pF, Max Operating Temperature=85°C, Min Operating Temperature=-40°C, Package Quantity=1000, Resistor Type=Ceramic, Series Resistance=500R, Depth=3.2mm, Height=0.051inch, Lead Free="Lead Free", Length=5mm, Mount="Surface Mount", Number of Pins=2, Packaging="Tape and Reel", Radiation Hardening=No, RoHS Compliant=Yes, Termination=SMD/SMT, Tolerance=20ppm, Width=3.2mm

## Free pads (board coordinates)
  round 5 hole 3.2: 0(11.953,-58.063) 0(26.177,-3.453) 0(128.096,-23.646)

## Via types
v1: diameter 0.5, hole 0.3, Top Layer to Bottom Layer, tented both sides, 819 vias
v2: diameter 0.5, hole 0.2, Top Layer to Bottom Layer, 20 vias
v3: diameter 0.508, hole 0.3, Top Layer to Bottom Layer, tented both sides, 8 vias
v4: diameter 0.5, hole 0.3, Top Layer to Bottom Layer, 5 vias

## Nets (pads, with @x,y where several pads share a name; then routed paths per layer and width w, separated by ;. In a path a pad name is that pad's centre, name@x,y a point inside that pad or via, vN(x,y) a via of type N, cw(c..) or ccw(c..) an arc to the next point about the centre after c; other vN are vias at no path point)
2K25_THERMISTOR: J4.4 U20.3 | length 8
  Top Layer w0.2: U20.3@55.118,-57.516 56.627,-57.516 v1(56.642,-57.531)
  Power Plane w0.2: v1(56.642,-57.531) 56.723,-57.531 56.915,-57.723 61.948,-57.723 62.498,-57.173 J4.4@62.498,-56.896
3v3_ANA@250mA: C52.2 D28.2 D29.2 D31.2 D32.2 R25.2 R77.2 U16.5 U17.33 U17.39 U20.5 | length 118.5
  Top Layer w0.3: R25.2@67.912,-52.451 68.001,-52.362 68.923,-52.362 v1(68.961,-52.324) ; U17.33@107.923,-52.48 107.923,-53.313 v1(107.95,-53.34) ; U17.39@110.923,-52.48 110.958,-52.515 110.958,-52.896 111.148,-53.086 111.148,-53.213 v1(111.186,-53.251)
  Top Layer w0.305: U20.5@53.478,-58.166 53.464,-58.18 51.482,-58.18 R77.2@51.435,-58.227 51.435,-59.309 52.705,-60.579 68.834,-60.579 v1(69.977,-59.436)
  Top Layer w0.635: v1(99.441,-48.641) 99.487,-48.687 99.487,-49.522 99.495,-49.53 C52.2@99.5,-49.53 99.505,-49.53 100.178,-50.203 100.178,-51.23 100.195,-51.247 U16.5@100.36,-51.247 ; D32.2@117.714,-48.657 117.714,-48.542 118.247,-48.009 118.247,-47.669 118.481,-47.434 118.481,-47.368 119.014,-46.835 D29.2@119.014,-46.72 119.03,-46.736 v1(119.888,-46.736) ; D28.2@117.714,-41.037 117.729,-41.022 v1(117.729,-39.751) ; D31.2@119.014,-54.34 119.014,-54.225 119.634,-53.605 v1(119.634,-53.34)
  Power Plane w0.3: v1(68.961,-49.784) 70.993,-47.752 90.932,-47.752 91.821,-48.641 v1(99.441,-48.641)
  Power Plane w0.635: v1(100.711,-55.118) 107.188,-55.118 107.95,-54.356 v1(107.95,-53.34) 110.998,-53.34 111.125,-53.213 111.163,-53.251 v1(111.186,-53.251) 119.545,-53.251 v1(119.634,-53.34)
  Bottom Layer w0.3: v1(68.961,-52.324) v1(68.961,-49.784)
  Bottom Layer w0.305: v1(68.961,-52.324) 69.977,-53.34 v1(69.977,-59.436)
  Bottom Layer w0.635: v1(99.441,-48.641) 99.441,-53.848 v1(100.711,-55.118) ; v1(117.729,-39.751) 119.888,-41.91 v1(119.888,-46.736) 120.208,-47.056 120.208,-52.766 v1(119.634,-53.34)
3v3_dig@2A: BUZ1.1 C1.2 C3.2 C5.2 C21.2 C22.2 C27.2 C28.2 C42.2 C50.2 C59.2 J3.2 J6.1 L1.2 R2.2 R9.2 R31.2 R32.2 R37.2 R38.2 R43.1 R59.2 R71.2 R80.2 U1.2 U4.4 U4.5 U9.4 U17.31 | length 44.1
  Top Layer w0.254: v1(102.362,-51.181) 102.365,-51.184 R59.2@103.16,-51.184 ; C59.2@105.402,-53.797 105.402,-53.777 105.585,-53.594 C59.2@105.605,-53.594 ; v1(105.664,-54.356) 105.605,-54.297 C59.2@105.605,-53.594 ; U17.31@106.923,-52.48 106.923,-52.562 106.911,-52.574 106.067,-52.574 105.808,-52.832 105.808,-53.411 105.625,-53.594 C59.2@105.605,-53.594
  Top Layer w0.3: R9.2@24.765,-60.292 24.765,-60.317 24.94,-60.492 24.965,-60.492 25.052,-60.579 v1(25.781,-60.579) ; U9.4@31.328,-47.926 31.328,-48.806 31.544,-49.022 C50.2@31.564,-49.022 31.564,-49.725 31.577,-49.738 v1(31.702,-49.738) ; U4.5@38.313,-37.38 38.313,-37.605 38.938,-38.23 U4.4@39.163,-38.23 39.388,-38.23 39.714,-37.904 40.277,-37.904 40.437,-37.744 C1.2@40.437,-37.724 40.437,-37.008 40.386,-36.957 40.394,-36.949 v1(40.439,-36.949) ; v1(43.18,-22.352) 43.213,-22.319 R38.2@43.213,-21.209 ; v1(45.085,-60.861) 45.123,-60.823 45.951,-60.823 R80.2@46.101,-60.673 ; R32.2@46.587,-30.205 46.587,-29.359 v1(46.609,-29.337) ; v1(50.419,-28.829) R37.2@50.419,-28.034 ; v1(105.791,-42.926) 105.791,-42.934 106.553,-43.696 R71.2@106.553,-43.721
  Top Layer w0.5: R43.1@34.925,-6.698 34.933,-6.706 34.933,-8.983 BUZ1.1@34.94,-8.99 ; v1(42.291,-11.049) R2.2@43.213,-11.049 ; C5.2@44.196,-8.89 44.196,-8.382 ; C3.2@44.196,-7.874 44.196,-8.382 ; U1.2@46.101,-8.509 45.974,-8.382 v1(44.958,-8.382) 44.196,-8.382 ; R31.2@67.056,-23.876 67.081,-23.876 68.199,-22.758 J6.1@68.199,-20.574
  Top Layer w0.7: v1(55.648,-49.742) 56.071,-50.165 v1(64.643,-50.165)
  Top Layer w1.27: v1(55.14,-34.096) 55.854,-34.81 v1(63.879,-34.81)
  other v1: 54.251,-48.472 52.346,-47.202 52.473,-44.154 52.473,-34.096 53.997,-34.096
4V@2A: C8.2 C24.2 C35.2 C36.2 C37.2 C38.2 C43.2 C49.2 D8.1 L3.2 R50.2 U2.34 U2.35 | length 7.7
  Top Layer w0.203: C8.2@65.024,-34.485 R50.2@65.024,-33.368 65.753,-33.368 v1(65.786,-33.401)
  Bottom Layer w0.203: v1(65.786,-33.401) 69.088,-30.099 v1(69.088,-28.956)
5V@2A: C23.2 C25.2 C26.2 C29.2 C30.2 C60.2 C61.2 L2.2 R45.2 R51.1 U9.15 U14.1 U16.1 U16.3 U17.11 U17.17 U17.18 | length 145.2
  Top Layer w0.2: v1(27.152,-46.547) 27.178,-46.521 27.178,-46.482 27.782,-46.482 27.838,-46.426 U9.15@28.528,-46.426 ; v1(58.166,-38.862) R45.2@59.879,-38.862
  Top Layer w0.203: v3(111.252,-45.72) 111.252,-45.802 111.423,-45.973 U17.11@111.423,-46.68
  Top Layer w0.305: C60.2@107.823,-44.636 107.955,-44.769 107.955,-46.463 108.173,-46.68 U17.17@108.423,-46.68 108.423,-46.57 108.204,-46.351 v3(108.204,-45.593) 108.204,-45.424 108.969,-44.659 C61.2@108.969,-44.639
  Top Layer w0.5: v1(97.409,-50.038) 97.409,-50.896 97.51,-50.997 97.51,-51.197 97.56,-51.247 U16.1@97.76,-51.247 ; v1(97.536,-54.229) 97.536,-53.197 97.586,-53.147 U16.3@97.76,-53.147
  Top Layer w0.508: C61.2@108.969,-44.639 108.969,-44.619 C61.2@109.025,-44.563
  Power Plane w0.5: v1(27.178,-44.577) 27.559,-44.196 42.799,-44.196 43.942,-45.339 v1(58.039,-45.339) 64.389,-45.339 64.516,-45.212 v1(64.995,-45.212) ; v1(69.85,-43.307) 97.2,-43.307 v1(97.486,-43.593) 106.204,-43.593 v3(108.204,-45.593)
  Bottom Layer w0.2: v1(58.039,-45.339) 58.166,-45.212 v1(58.166,-38.862)
  Bottom Layer w0.305: v3@108.225,-45.614 111.146,-45.614 v3(111.252,-45.72) v3@111.273,-45.741
  Bottom Layer w0.5: U14.1@15.33,-20.954 15.63,-20.954 16.53,-21.854 21.166,-21.854 21.176,-21.844 22.987,-21.844 27.559,-26.416 27.559,-29.21 27.178,-29.591 v1(27.178,-44.577) 26.815,-44.94 26.815,-45.577 26.805,-45.587 26.805,-46.107 27.152,-46.454 v1(27.152,-46.547) ; v1(97.486,-43.593) 97.486,-49.961 v1(97.409,-50.038) 97.409,-54.102 v1(97.536,-54.229)
10K_THERMISTOR: C4.2 D11.1 J2.1 R25.1 R79.1 | length 6.9
  Top Layer w0.203: J2.1@66.294,-57.531 66.294,-54.778 R79.1@65.872,-54.356 ; R25.1@66.962,-52.451 67.017,-52.506 67.017,-53.467 D11.1@67.017,-54.356 66.962,-54.356 66.939,-54.379 66.939,-54.434 66.595,-54.778 66.269,-54.778 66.095,-54.604 66.095,-54.579 R79.1@65.872,-54.356 ; R79.1@65.872,-54.356 R79.1@65.847,-54.356 R79.1@65.872,-54.356
AFE_CS: U1.23 U17.27 | length 72.7
  Top Layer w0.203: U1.23@58.026,-24.999 58.026,-27.546 v1(58.039,-27.559) ; v3(102.743,-49.403) 102.997,-49.657 104.357,-49.657 105.03,-50.33 U17.27@106.273,-50.33
  Power Plane w0.203: v1(58.039,-27.559) 63.24,-27.559 63.317,-27.635 77.038,-27.635 78.867,-29.464 v1(81.407,-29.464) ; v1(81.407,-49.149) 85.384,-49.149 86.781,-50.546 101.6,-50.546 v3(102.743,-49.403)
  Bottom Layer w0.203: v1(81.407,-49.149) v1(81.407,-29.464)
AFE_READY: R34.2 U1.26 U17.28 | length 69.9
  Top Layer w0.203: U1.26@61.836,-24.999 61.836,-26.944 R34.2@61.849,-26.957 62.959,-26.957 v1(62.992,-26.924) ; v3(103.378,-50.292) 104.32,-50.292 104.858,-50.83 U17.28@106.273,-50.83
  Power Plane w0.203: v1(62.992,-26.924) 63.072,-26.924 63.453,-27.305 102.73,-27.305 102.984,-27.051 v1(102.997,-27.051)
  Bottom Layer w0.203: v1(102.997,-27.051) 103.399,-27.453 v3@103.399,-50.313
AN_SWITCH_S: U1.38 U20.6 | length 69.9
  Top Layer w0.152: 47.084,-57.15 47.084,-56.007 47.333,-56.256 53.007,-56.256 53.215,-56.463 v1(53.309,-56.463) ; v1(53.344,-59.93) 53.478,-59.796 U20.6@53.478,-58.816 ; v1(62.103,-10.033) 62.197,-10.033 62.451,-9.779 U1.38@63.601,-9.779
  Power Plane w0.152: v1(53.34,-9.398) 61.468,-9.398 v1(62.103,-10.033)
  Bottom Layer w0.152: v1(53.34,-9.398) 53.309,-9.429 v1(53.309,-56.463) 53.309,-56.484 53.344,-56.519 v1(53.344,-59.93)
BAT_EN: Q6.1 R40.2 R47.2 U19.1 | length 1.8
  Top Layer w0.203: 37.305,-56.261 U19.1@39.083,-56.261
BAT_P: D12.3 D35.1 D35.2 D36.1 D36.2 R28.1
BAT_PROTECTED: D33.2 D35.3 D36.3 Q1.3 R30.1 R75.2 R86.2 R95.1 U22.1 U22.3 | length 74.1
  Top Layer w0.2: v1(27.94,-12.573) 28.768,-12.573 R86.2@28.956,-12.385 ; v1(28.956,-25.146) 29.037,-25.146 29.164,-25.019 R95.1@29.751,-25.019 ; v1(29.085,-32.784) 29.085,-32.703 29.366,-32.422 29.366,-32.069 R30.1@29.591,-31.844 ; D33.2@29.956,-18.735 29.956,-17.796 v1(29.972,-17.78) ; v1(35.111,-57.658) 36.289,-57.658 R75.2@36.322,-57.691
  Top Layer w0.5: U22.1@34.356,-20.35 34.406,-20.3 34.406,-19.569 v1@34.925,-19.05 ; v1(34.925,-19.005) v1@34.925,-19.05 ; U22.3@36.256,-20.35 36.206,-20.3 36.206,-19.569 35.687,-19.05 v1@34.925,-19.05
  Top Layer w2.54: Q1.3@2.712,-21.975 2.921,-22.184 v1(2.921,-23.622)
  Bottom Layer w0.2: v1(6.731,-26.162) 6.731,-26.081 6.884,-25.928 6.884,-24.648 D36.3@8.859,-22.673 ; v1(27.94,-12.573) v1(27.94,-16.217) 28.956,-17.233 28.956,-25.527 28.956,-29.195 29.085,-29.324 v1(29.085,-32.784) 29.076,-32.793 29.076,-51.809 34.969,-57.702 35.135,-57.702 35.179,-57.658 v1@35.112,-57.658
  Bottom Layer w0.5: v1(34.925,-19.005) 34.925,-17.244 v1(35.262,-16.907)
  Bottom Layer w2.54: v1(2.921,-23.622) 2.921,-21.066 D35.3@3.429,-20.558 ; D35.3@4.489,-21.618 8.054,-21.618 8.859,-22.423 D36.3@8.859,-22.673
  other v1: 2.254,-24.307 3.397,-24.307 2,-23.418 3.778,-23.418
CHARGER_EN: U1.11 U23.13
D_N: D39.2 J7.2 U1.13 | length 76.7
  Top Layer w0.194: v4(43.912,-30.14) 44.088,-30.14 44.129,-30.099 44.129,-24.101 45.228,-23.002 45.578,-23.002 U1.13@46.101,-22.479 ; v4(44.577,-42.537) 45.72,-43.68 45.72,-45.853 51.496,-51.629 68.84,-51.629 72.463,-48.006 82.677,-48.006 86.073,-51.402 86.225,-51.402 D39.2@86.868,-52.045 88.113,-52.045 89.956,-53.888 J7.2@90.297,-53.888
  Bottom Layer w0.194: v4(43.912,-30.14) 44.051,-30.278 44.051,-31.701 44.51,-32.16 44.51,-36.897 43.975,-37.432 43.975,-41.889 44.577,-42.491 v4(44.577,-42.537)
D_P: D30.2 J7.3 U1.14 | length 74.6
  Top Layer w0.194: v4(44.577,-41.783) 46.041,-43.247 46.041,-45.72 51.629,-51.308 68.707,-51.308 72.33,-47.685 82.81,-47.685 86.206,-51.081 86.315,-51.081 86.571,-50.825 D30.2@86.868,-50.825 86.965,-50.922 87.444,-50.922 88.873,-52.351 89.834,-52.351 J7.3@90.297,-51.888 ; v4(44.666,-30.14) 44.491,-30.14 44.45,-30.099 44.45,-25.4 U1.14@46.101,-23.749
  Bottom Layer w0.194: v4(44.577,-41.783) 44.323,-41.783 44.296,-41.756 44.296,-37.565 44.831,-37.03 44.831,-31.869 44.999,-31.701 44.999,-30.472 v4(44.666,-30.14)
DC_ACTUATORS: J9.4 Q5.2 R5.1 R22.1 U4.2 U4.15 | length 95.4
  Top Layer w0.2: U4.15@37.663,-41.03 37.673,-41.04 37.673,-42.113 v1(37.683,-42.123) ; U4.2@39.163,-39.53 39.197,-39.564 40.544,-39.564 v1(40.578,-39.598)
  Top Layer w2.54: J9.4@3.952,-30.861 11.557,-30.861 14.224,-28.194 19.558,-28.194 21.544,-26.208 21.544,-23.855 23.174,-22.225 Q5.2@23.374,-22.225 ; v1(8.255,-38.608) 8.558,-38.911 R5.1@11.43,-38.911 ; R22.1@13.413,-53.467 14.986,-53.467 v1(15.113,-53.34)
  Power Plane w0.2: v1(8.255,-38.608) 34.925,-38.608 37.683,-41.366 v1(37.683,-42.123) 40.151,-39.655 40.52,-39.655 v1(40.578,-39.598)
  Bottom Layer w2.54: J9.4@3.952,-30.861 8.255,-35.164 8.255,-48.169 9.743,-49.657 11.43,-49.657 12.323,-50.55 12.493,-50.55 13.458,-51.515 13.458,-51.685 v1(15.113,-53.34)
DC_DC_EN: R84.2 SW2.5 U6.5 U10.5 U11.5 | length 145.3
  Top Layer w0.2: 36.355,-56.261 36.449,-56.167 v1(36.449,-55.118) ; v1(49.022,-30.226) 49.438,-30.642 U10.5@49.438,-31.729 ; U11.5@62.73,-40.386 62.738,-40.378 62.738,-38.501 63.266,-37.973 v1(65.024,-37.973) ; v1(63.5,-30.353) 63.557,-30.41 63.557,-30.782 64.522,-31.747 65.431,-31.747 v1@65.612,-31.566 ; v1@65.786,-31.566 U6.5@66.756,-31.566
  Top Layer w0.5: SW2.5@15.447,-4.032 18.984,-7.569 ; 18.984,-9.652 18.984,-7.569 ; v1(27.686,-7.493) 27.61,-7.569 18.984,-7.569 ; R84.2@27.813,-36.736 27.813,-36.711 27.948,-36.576 28.989,-36.576 29.014,-36.576 29.089,-36.501 29.089,-36.038 30.06,-35.067 30.16,-35.067 31.384,-35.067 v1(31.496,-35.179)
  Power Plane w0.2: v1(30.988,-50.292) 35.479,-50.292 35.606,-50.165 v1(35.687,-50.165) ; v1(31.496,-35.179) 33.401,-37.084 39.175,-37.084 39.996,-37.904 42.476,-37.904 v1(42.545,-37.973) ; v1(43.053,-25.654) 46.609,-25.654 v1(47.879,-26.924) ; v1(49.022,-30.226) 49.022,-28.575 49.53,-28.067 51.435,-28.067 53.371,-30.003 63.15,-30.003 v1(63.5,-30.353)
  Bottom Layer w0.2: v1(30.988,-50.292) 30.988,-48.387 31.63,-47.745 31.63,-35.394 31.496,-35.26 v1(31.496,-35.179) ; v1(35.687,-50.165) 35.687,-54.356 v1(36.449,-55.118) ; v1(42.545,-37.973) 43.053,-37.465 v1(43.053,-25.654) ; v1(47.879,-26.924) 49.022,-28.067 v1(49.022,-30.226) ; v1(65.024,-37.973) 65.024,-32.385 v1(65.786,-31.623)
  Bottom Layer w0.5: v1(27.686,-7.493) 30.599,-10.406 30.599,-18.04 29.599,-19.04 29.599,-26.351 29.972,-26.724 29.972,-34.036 31.115,-35.179 v1(31.496,-35.179)
DC_IN: D6.1 D33.1 D34.2 J15.2 Q7.2 R27.1 | length 35.4
  Top Layer w0.2: Q7.2@23.374,-14.351 26.174,-17.151 27.819,-17.151 28.956,-18.288 28.956,-19.162 29.946,-20.152 29.946,-20.625 29.973,-20.652 D34.2@31.975,-20.652
  Top Layer w2.54: Q7.2@23.374,-14.351 23.574,-14.351 Q7.2@25.204,-12.721
  Bottom Layer w2.54: J15.2@8.763,-3.556 9.476,-4.269 R27.1@12.573,-4.269 12.573,-7.493 14.097,-9.017 16.17,-9.017 D6.1@16.256,-9.103 16.678,-9.525 25.273,-9.525
  other v1: 21.209,-10.033 22.479,-10.033 23.622,-10.033 24.765,-10.033 26.035,-10.033 20.447,-8.763 21.717,-8.763 22.86,-8.763 24.003,-8.763 25.273,-8.763
DC_SYS: C31.2 C32.2 C34.2 C39.2 C40.2 C41.2 C44.2 C45.2 C46.2 C71.2 C72.2 C73.2 Q5.3 R1.1 R39.1 R84.1 U4.11 U6.1 U10.1 U11.1 U23.2 U23.3 U23.8 U23.9 | length 52.4
  Top Layer w0.2: R84.1@27.813,-37.686 27.813,-37.711 28.575,-38.473 v1(28.575,-39.497) ; v1(34.417,-39.497) 34.433,-39.513 35.496,-39.513 U4.11@35.513,-39.53 ; v1(36.338,-23.109) 36.84,-22.607 36.84,-20.99 36.856,-20.974 36.856,-20.929 38.1,-19.685 R39.1@38.895,-19.685
  Top Layer w0.5: 35.687,-27.051 36.449,-27.051 ; v1(36.338,-23.109) v1@36.338,-23.327 ; v1(37.719,-24.003) 37.041,-24.003 36.359,-24.685 35.759,-24.685 35.659,-24.585 35.659,-24.535 36.056,-24.535 36.338,-24.253 ; 36.338,-24.253 v1@36.338,-23.327 ; 36.338,-24.253 v1(36.801,-23.79) v1@36.338,-23.327
  Top Layer w0.75: 36.449,-27.051 37.335,-27.051 37.473,-27.189 38.099,-27.189 38.227,-27.317 C71.2@38.227,-27.366
  Top Layer w1.27: R1.1@12.397,-24.638 R1.1@12.458,-24.577 ; Q5.3@16.112,-24.577 Q5.3@16.174,-24.515 ; C71.2@38.227,-27.366 38.989,-27.366 ; v1(38.989,-26.543) 38.989,-27.366 ; C72.2@39.878,-27.366 38.989,-27.366
  Power Plane w0.2: v1(14.114,-26.018) 14.114,-29.608 v1(14.732,-30.226) ; v1(15.113,-39.497) v1(28.575,-39.497) v1(34.417,-39.497)
  Bottom Layer w0.2: v1(14.732,-30.226) 14.732,-31.038 15.072,-31.378 15.072,-39.456 v1(15.113,-39.497)
  other v1: 55.71,-43.836 57.234,-43.836 55.71,-42.566 68.995,-38.579 70.265,-38.579 70.265,-37.055 42.418,-35.179 43.942,-35.179 42.418,-33.909 16.764,-26.035 18.796,-25.781 19.177,-24.13 14.041,-22.606 15.748,-22.606 17.399,-22.606 19.177,-22.606
DEBUG_RX: J3.5 U1.36 | length 15.4
  Top Layer w0.203: U1.36@63.601,-12.319 64.77,-12.319 65.936,-13.485 66.96,-14.509 69.604,-14.509 69.723,-14.628 v1(69.723,-15.24)
  Bottom Layer w0.203: v1(69.723,-15.24) 69.723,-20.447 70.485,-21.209 J3.5@71.882,-21.209
DEBUG_TX: J3.3 U1.37 | length 13.6
  Top Layer w0.203: U1.37@63.601,-11.049 v1(65.024,-11.049)
  Bottom Layer w0.203: v1(65.024,-11.049) 65.024,-12.573 65.968,-13.517 65.968,-13.692 66.785,-14.509 69.669,-14.509 70.202,-15.042 70.202,-16.989 J3.3@71.882,-18.669
DGND: C1.1 C2.1 C3.1 C4.1 C5.1 C7.1 C8.1 C9.1 C10.1 C11.1 C12.1 C13.1 C15.1 C17.1 C21.1 C22.1 C23.1 C24.1 C25.1 C26.1 C27.1 C28.1 C29.1 C30.1 C31.1 C32.1 C33.1 C34.1 C35.1 C36.1 C37.1 C38.1 C39.1 C40.1 C41.1 C42.1 C43.1 C44.1 C45.1 C46.1 C49.1 C50.1 C52.1 C53.1 C54.1 C55.1 C56.1 C57.1 C58.1 C59.1 C60.1 C61.1 C63.1 C64.1 C65.1 C66.1 C67.1 C68.1 C69.1 C70.1 C71.1 C72.1 C73.1 C75.1 C77.1 C78.1 D1.1 D2.2 D3.1 D4.2 D5.2 D6.2 D7.2 D8.2 D10.2 D11.2 D28.1 D29.1 D30.1 D31.1 D32.1 D39.1 D40.1 J2.2 J3.4 J6.3 J6.5 J6.7 J6.9 J7.4 J7.5 J7.6 J14.7 J14.10 J14.11 J15.1 pad.0 Q2.3 Q3.2 Q4.2 Q6.2 Q8.2 Q9.2 R3.2 R11.1 R19.1 R21.1 R23.1 R33.1 R34.1 R35.1 R36.2 R41.1 R46.1 R57.1 R76.1 R83.1 R87.1 R89.2 R90.1 R92.1 R94.1 RF_PCB1.2 SW2.3 SW2.6 U1.1 U1.40 U1.41 U1.42 U1.43 U1.44 U1.45 U1.46 U1.47 U1.48 U1.49 U2.8 U2.13 U2.19 U2.21 U2.23 U2.27 U2.30 U2.31 U2.33 U2.36 U2.37 U2.39 U3.1 U3.9 U4.3 U4.17@37.338,-39.205 U5.2 U5.3 U6.3 U7.2 U7.3 U9.3 U9.5 U9.17@30.353,-46.101 U10.3 U11.3 U12.A1 U12.A12 U12.B1 U12.B12 U13.A1 U13.A12 U13.B1 U13.B12 U14.3 U16.2 U17.3 U17.8 U17.12 U17.13 U17.16 U17.19 U17.32 U17.36 U17.40 U17.41 U19.4 U20.2 U21.8 U22.2 U23.10 U23.11 U23.27 | length 45.2